# Altium PCB PCB1.PcbDoc
Units mil, origin at the board's own origin, x right, y up, seen from the top; angles counter-clockwise.
Board outline 1765 x 1670 mil, 2 copper layers (Top Layer, Bottom Layer); 10 components, 6 nets, 21 pads, 0 vias.
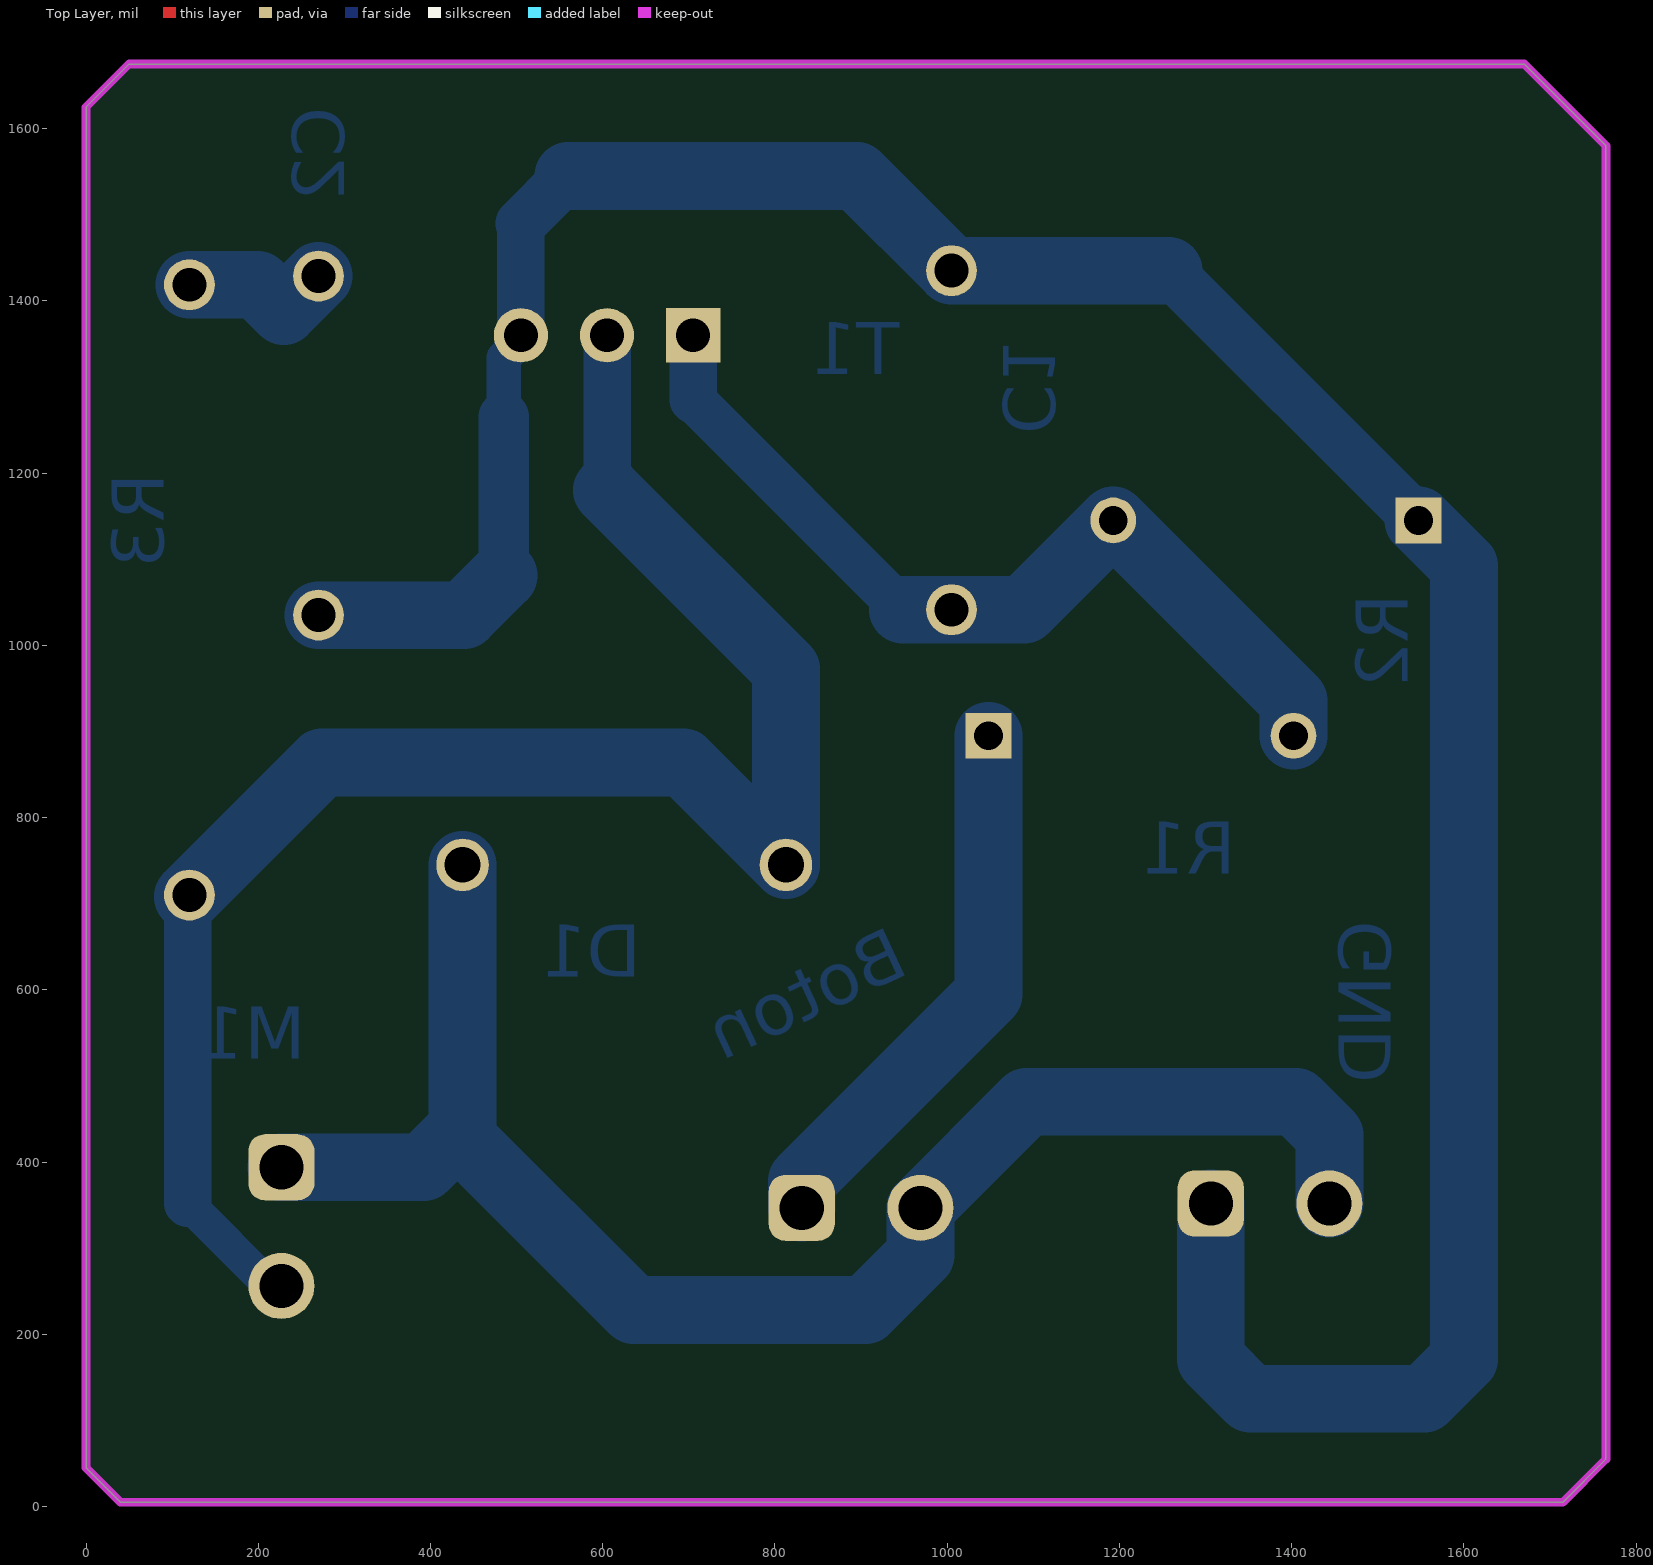
[diagram p0: Top Layer view]
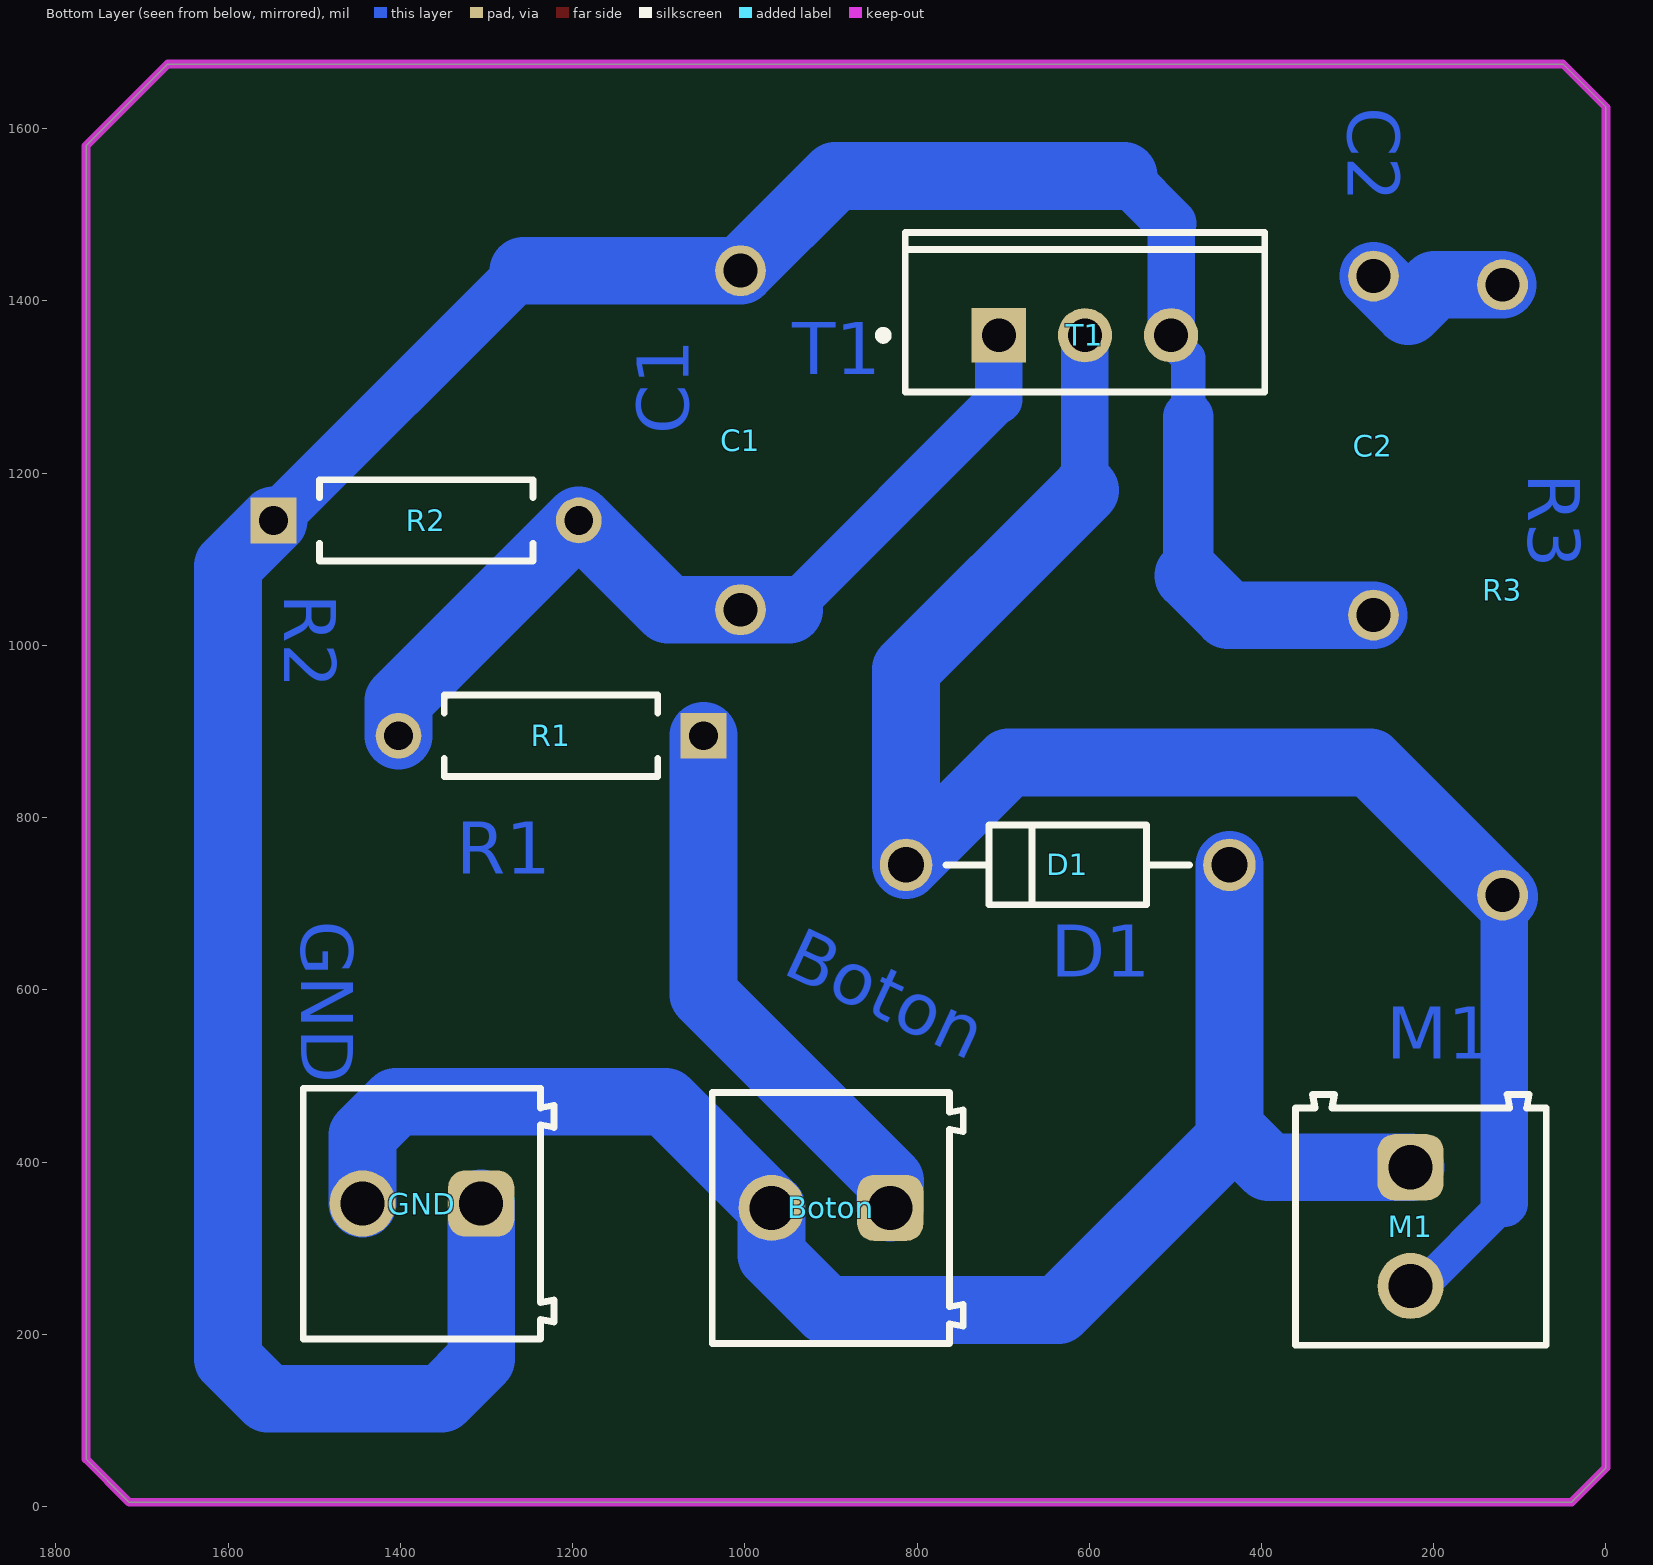
[diagram p1: Bottom Layer view, seen from below]

## Layer stack, top to bottom
Top Solder: solder mask 0.4, Solder Resist, Dk 3.5
Top Layer: signal copper 1.4
Dielectric 1: dielectric 12.6, FR-4, Dk 4.8
Bottom Layer: signal copper 1.4
Bottom Solder: solder mask 0.4, Solder Resist, Dk 3.5

## Board outline
40,5 0,45 0,1625 50,1675 1670,1675 1765,1580 1765,55 1715,5

## Design rules (kind name [scope] priority, off if disabled: settings)
Clearance [All] p1: gap=10 ignorepadtopadclearanceinfootprint=FALSE except(39.37: Arc-Arc Arc-Track Arc-SMDPad Arc-THPad Track-Track Track-SMDPad Track-THPad SMDPad-SMDPad SMDPad-THPad THPad-THPad)
PolygonConnect [All] p1: connectstyle=Relief reliefconductorwidth=10 reliefentries=4 polygonreliefangle="90 Angle" airgapwidth=10
RoutingLayers [All] p1: top layer_v5=TRUE bottom layer_v5=FALSE
RoutingVias [All] p1: holewidth=28 width=50 viastyle="Through Hole" minholewidth=28 minwidth=50 maxholewidth=28 maxwidth=50
SolderMaskExpansion [All] p1: expansion=0 istentingtop=FALSE
Width [All] p1: maxlimit=78.74 minlimit=39.37 preferedwidth=78.74 minimp=50.000000 maximp=50.000000 favimp=50.000000
29 further rules are at their usual default settings.

## Components (designator, comment, footprint, x,y, rotation, side; value= is the part's Value field where it differs from the comment)
Boton "" 691214110002 900,335 r0 bottom
C1 "Cap Ceramico" PCBComponent_1#1 1005,1041.3 r90 bottom
C2 "Cap10mm" PCBComponent_1#1 270,1428.7 r270 bottom
D1 "1N5819" ONSC-AXIAL_LEAD-2-59-10_P 625,745 r180 bottom
GND "+" 691214110002 1375,340 r0 bottom
M1 "691214110002" 691214110002 215,325 r270 bottom
R1 "MFR-25FBF52-100R" RESA60-630X240 1225,895 r0 bottom value=100
R2 "MFR-25FBF52-10K" RESA60-630X240 1370,1145 r180 bottom value=10k
R3 "R10ohm" PCBComponent_1#2 120,710 r90 bottom
T1 "IRF520NPBF" INTR-TO-220AB-3 605,1360 r90 bottom

## Footprints (in the part's own frame and the unit in brackets; to place one, negate y for a bottom-side part, rotate by r counter-clockwise, add the part's x,y. Pads: shape width x height; smd on the part's side, far side on the other; paste and mask are expansions set on the pad)
691214110002 [mm] "3.50 mm Horizontal Entry Modular, 2p"
  rrect50% 1.95x1.95 hole 1.3: 1(-1.75,-0.3)
  round 1.95 hole 1.3: 2(1.75,-0.3)
  silkscreen extent -3.9,-3.7 3.5,3.7, body extent -3.95,-3.7 3.5,3.7, height 8.55
INTR-TO-220AB-3 [mm] "FM, 3-Leads, Body 10.55x4.7mm, Pitch 2.54mm"
  rect 1.6x1.6 hole 1: 1(0,2.54)
  round 1.6 hole 1: 2(0,0) 3(0,-2.54)
  silkscreen extent -1.67,-5.3 3.03,6.08, body extent -1.67,-5.28 3.03,5.28, height 19.3
ONSC-AXIAL_LEAD-2-59-10_P [mm] "AXIAL, 2-Leads, Diameter 2.35mm"
  round 1.55 hole 1.05: 1(-4.77,0) 2(4.77,0)
  silkscreen extent -3.6,-1.18 3.6,1.18, body extent -5.16,-1.18 5.16,1.18, height 2.35
PCBComponent_1#1 [mm]
  round 1.5 hole 1: 1(0,0) 2(10,0)
PCBComponent_1#2 [mm]
  round 1.5 hole 1: 4(18,0) 5(0,0)
RESA60-630X240 [mm] "Axial Resistor, 2-Leads, Dia 2.4mm, Body Length 6.3mm"
  rect 1.35x1.35 hole 0.85: 1(-4.5,0)
  round 1.35 hole 0.85: 2(4.5,0)
  silkscreen extent -3.15,-1.2 3.15,1.2, body extent -4.78,-1.2 4.78,1.2, height 2.4

## Part data
Boton GND M1: library part CMP-1502-02464-3, "2141 Series 3.5MM Pitch Straight, Pcb Terminal Block, Through Hole, 2 Way", Color="Blue, Green", Current=10A, Max Operating Temperature=105°C, Min Operating Temperature=-40°C, Voltage=300V, Contact Material=Tin, Contact Plating="Brass, Tin", Current Rating=10A, Height=8.7mm, Housing Material=Nylon, Lead Pitch=3.5mm, Length=7.4mm, Mount="Through Hole", Number of Contacts=2, Number of Levels=1, Number of Pins=2, Number of Positions Per Level=2, Number of Rows=1, Packaging=Box, Pitch=3.5052mm, Plating="Brass, Steel", RoHS=Compliant, Stripping Length=-6mm, Termination=Screw, Voltage Rating=300V, Width=7.9mm, Wire Gauge (Max)=24AWG, Wire Gauge (Min)=16AWG, Wire/Cable Gauge=24AWG
C1: "THT 1mm pad"
C2: "Capacitor poliester 100nF,10mm"
D1: library part CMP-004-00009-2, "Low Drop Power Schottky Rectifier, 40 V, 1 A, 2-Pin DO-41, RoHS", Case/Package=DO, Forward Current=1A, Manufacturer="ON Semiconductor", Max Operating Temperature=125°C, Max Surge Current=25A, Min Operating Temperature=-65°C, Package Description="2-Pin, Axial Lead, Diameter 2.35 mm", Package Reference=AXIAL_LEAD-2-59-10, Package Version="Rev. U, 02/2005", Peak Reverse Current=1mA, Datasheet URL=http://www.onsemi.cn/pub_link/Collateral/1N5817-D.PDF, Datasheet Version="Rev. 10, 07/2006", Manufacturer URL=http://www.onsemi.com/, Mounting Technology=TH, Package URL=http://www.onsemi.cn/pub_link/Collateral/59-10.PDF, Packaging=Bulk, Pins=2, RoHS Compliant=True
R1: library part CMP-009-00046-4, "Axial Resistor, 100 Ohm, +/- 1%, 0.25 W, -55 to 155 degC, 2-Pin THD, RoHS, Bulk", Case/Package=Axial, Manufacturer=Yageo, Max Operating Temperature=155°C, Min Operating Temperature=-55°C, Package Description="2-Pin Axial Lead, Dia 2.4 mm, Body Length 6.3 mm", Package Quantity=200, Package Reference=MFR-25, Power=250mW, Tolerance=1%, Voltage Rating=250V, Composition=CarbonFilm, Datasheet URL=http://www.yageo.com/documents/recent/Yageo%20LR_MFR_2013.pdf, Datasheet Version=Apr-13, Manufacturer URL=http://www.yageo.com/, Mounting Technology=TH, Packaging=Bulk, RoHS Compliant=True
R2: library part CMP-009-00047-4, "Axial Resistor, 10 KOhm, +/- 1%, 0.25 W, -55 to 155 degC, 2-Pin THD, RoHS, Bulk", Case/Package=Axial, Manufacturer=Yageo, Max Operating Temperature=155°C, Min Operating Temperature=-55°C, Package Description="2-Pin Axial Lead, Dia 2.4 mm, Body Length 6.3 mm", Package Quantity=200, Package Reference=MFR-25, Power=250mW, Tolerance=1%, Voltage Rating=250V, Datasheet URL=http://www.yageo.com/documents/recent/Yageo%20LR_MFR_2013.pdf, Datasheet Version=Apr-13, Manufacturer URL=http://www.yageo.com/, Mounting Technology=TH, Packaging=Bulk, RoHS Compliant=True
R3: "Pads 1mm,1W"
T1: library part CMP-013-00017-4, "HEXFET(R) Power MOSFET, 100 V, 9.7 A, 0.2 Ohm, -55 to 175 degC, 3-Pin FM (TO-220AB), RoHS, Tube", Case/Package=TO-220-3, Input Capacitance=330pF, Manufacturer="International Rectifier", Max Operating Temperature=175°C, Min Operating Temperature=-55°C, Nominal Dual Supply Voltage=100V, Package Description="3-Pin Flange Mount, Body 4.445 x 10.415 mm, Pitch 2.54 mm", Package Quantity=50, Package Reference=TO-220AB, Power=48W, Datasheet URL=http://www.infineon.com/dgdl/irf520npbf.pdf?fileId=5546d462533600a4015355e340711985, Datasheet Version=Nov-03, Elements=1, Mounting Technology=TH, Nominal Vgs=4V, Packaging=Rail/Tube, Pins=3, Rds On Max=200mohm, RoHS Compliant=True, Typical Rise Time=23ns

## Nets (pads, with @x,y where several pads share a name; then routed paths per layer and width w, separated by ;. In a path a pad name is that pad's centre, name@x,y a point inside that pad or via, vN(x,y) a via of type N, cw(c..) or ccw(c..) an arc to the next point about the centre after c; other vN are vias at no path point)
NetBoton_1: Boton.1 R1.1 | length 638
  Bottom Layer w78.74: Boton.1 831.1,378.1 1047.83,594.83 R1.1
NetBoton_2: Boton.2 D1.2 GND.2 M1.1 | length 1864.1
  Bottom Layer w78.74: M1.1 391.81,393.9 437.2,439.29 ; D1.2 437.2,439.29 ; GND.2 1443.9,431.03 1405,469.92 1092.01,469.92 Boton.2 968.9,291.9 905,228 636,228 437.2,426.8 437.2,439.29
NetC1_1: C1.1 R1.2 R2.2 T1.1 | length 1043.4
  Bottom Layer w51.18: 705,1285 948.7,1041.3
  Bottom Layer w55.12: 705,1285 T1.1
  Bottom Layer w78.74: 948.7,1041.3 C1.1 1089.13,1041.3 R2.2 1402.17,935.67 R1.2
NetC1_2: C1.2 C2.2 GND.1 R2.1 T1.3 | length 3395.1
  Bottom Layer w40: 485,1260.37 485,1333.78 505,1353.78 T1.3
  Bottom Layer w55.12: T1.3 505,1490
  Bottom Layer w59.06: 485,1081.12 485,1265 ; 505,1490 560,1545 ; 1257.17,1435 R2.1
  Bottom Layer w78.74: C2.2 438.88,1035 485,1081.12 ; 560,1545 895,1545 C1.2 1257.17,1435 ; GND.1 1306.1,171.12 1352.23,125 1553.88,125 1600,171.12 1600,1092.17 R2.1
NetC2_1: C2.1 R3.4 | length 179.4
  Bottom Layer w78.74: R3.4 199.04,1418.66 229.5,1388.2 C2.1
NetD1_1: D1.1 M1.2 R3.5 T1.2 | length 2032.9
  Bottom Layer w39.37: 118.11,351.89 M1.2@215,255
  Bottom Layer w40: M1.2@215,255 M1.2@245,255
  Bottom Layer w55.12: 118.11,351.89 R3.5@118.11,708.11 ; 605,1180 605,1255 T1.2
  Bottom Layer w78.74: R3.5@118.11,708.11 R3.5 274,864 693.8,864 D1.1 812.8,972.2 605,1180

## Keep-outs
Keep-Out Layer:
  the board outline again, w10